# Altium PCB stabilizer_current_sense.PcbDoc (part 3 of 3)
Units mm, origin at the board's own origin, x right, y up, seen from the top; angles counter-clockwise.
Board outline 113.55 x 100 mm, 4 copper layers (Top, L2, L3, Bottom Layer), stack 1.579 mm thick; 178 components, 65 nets, 463 pads, 231 vias.
Unrouted connection lines stored in the file: 53.
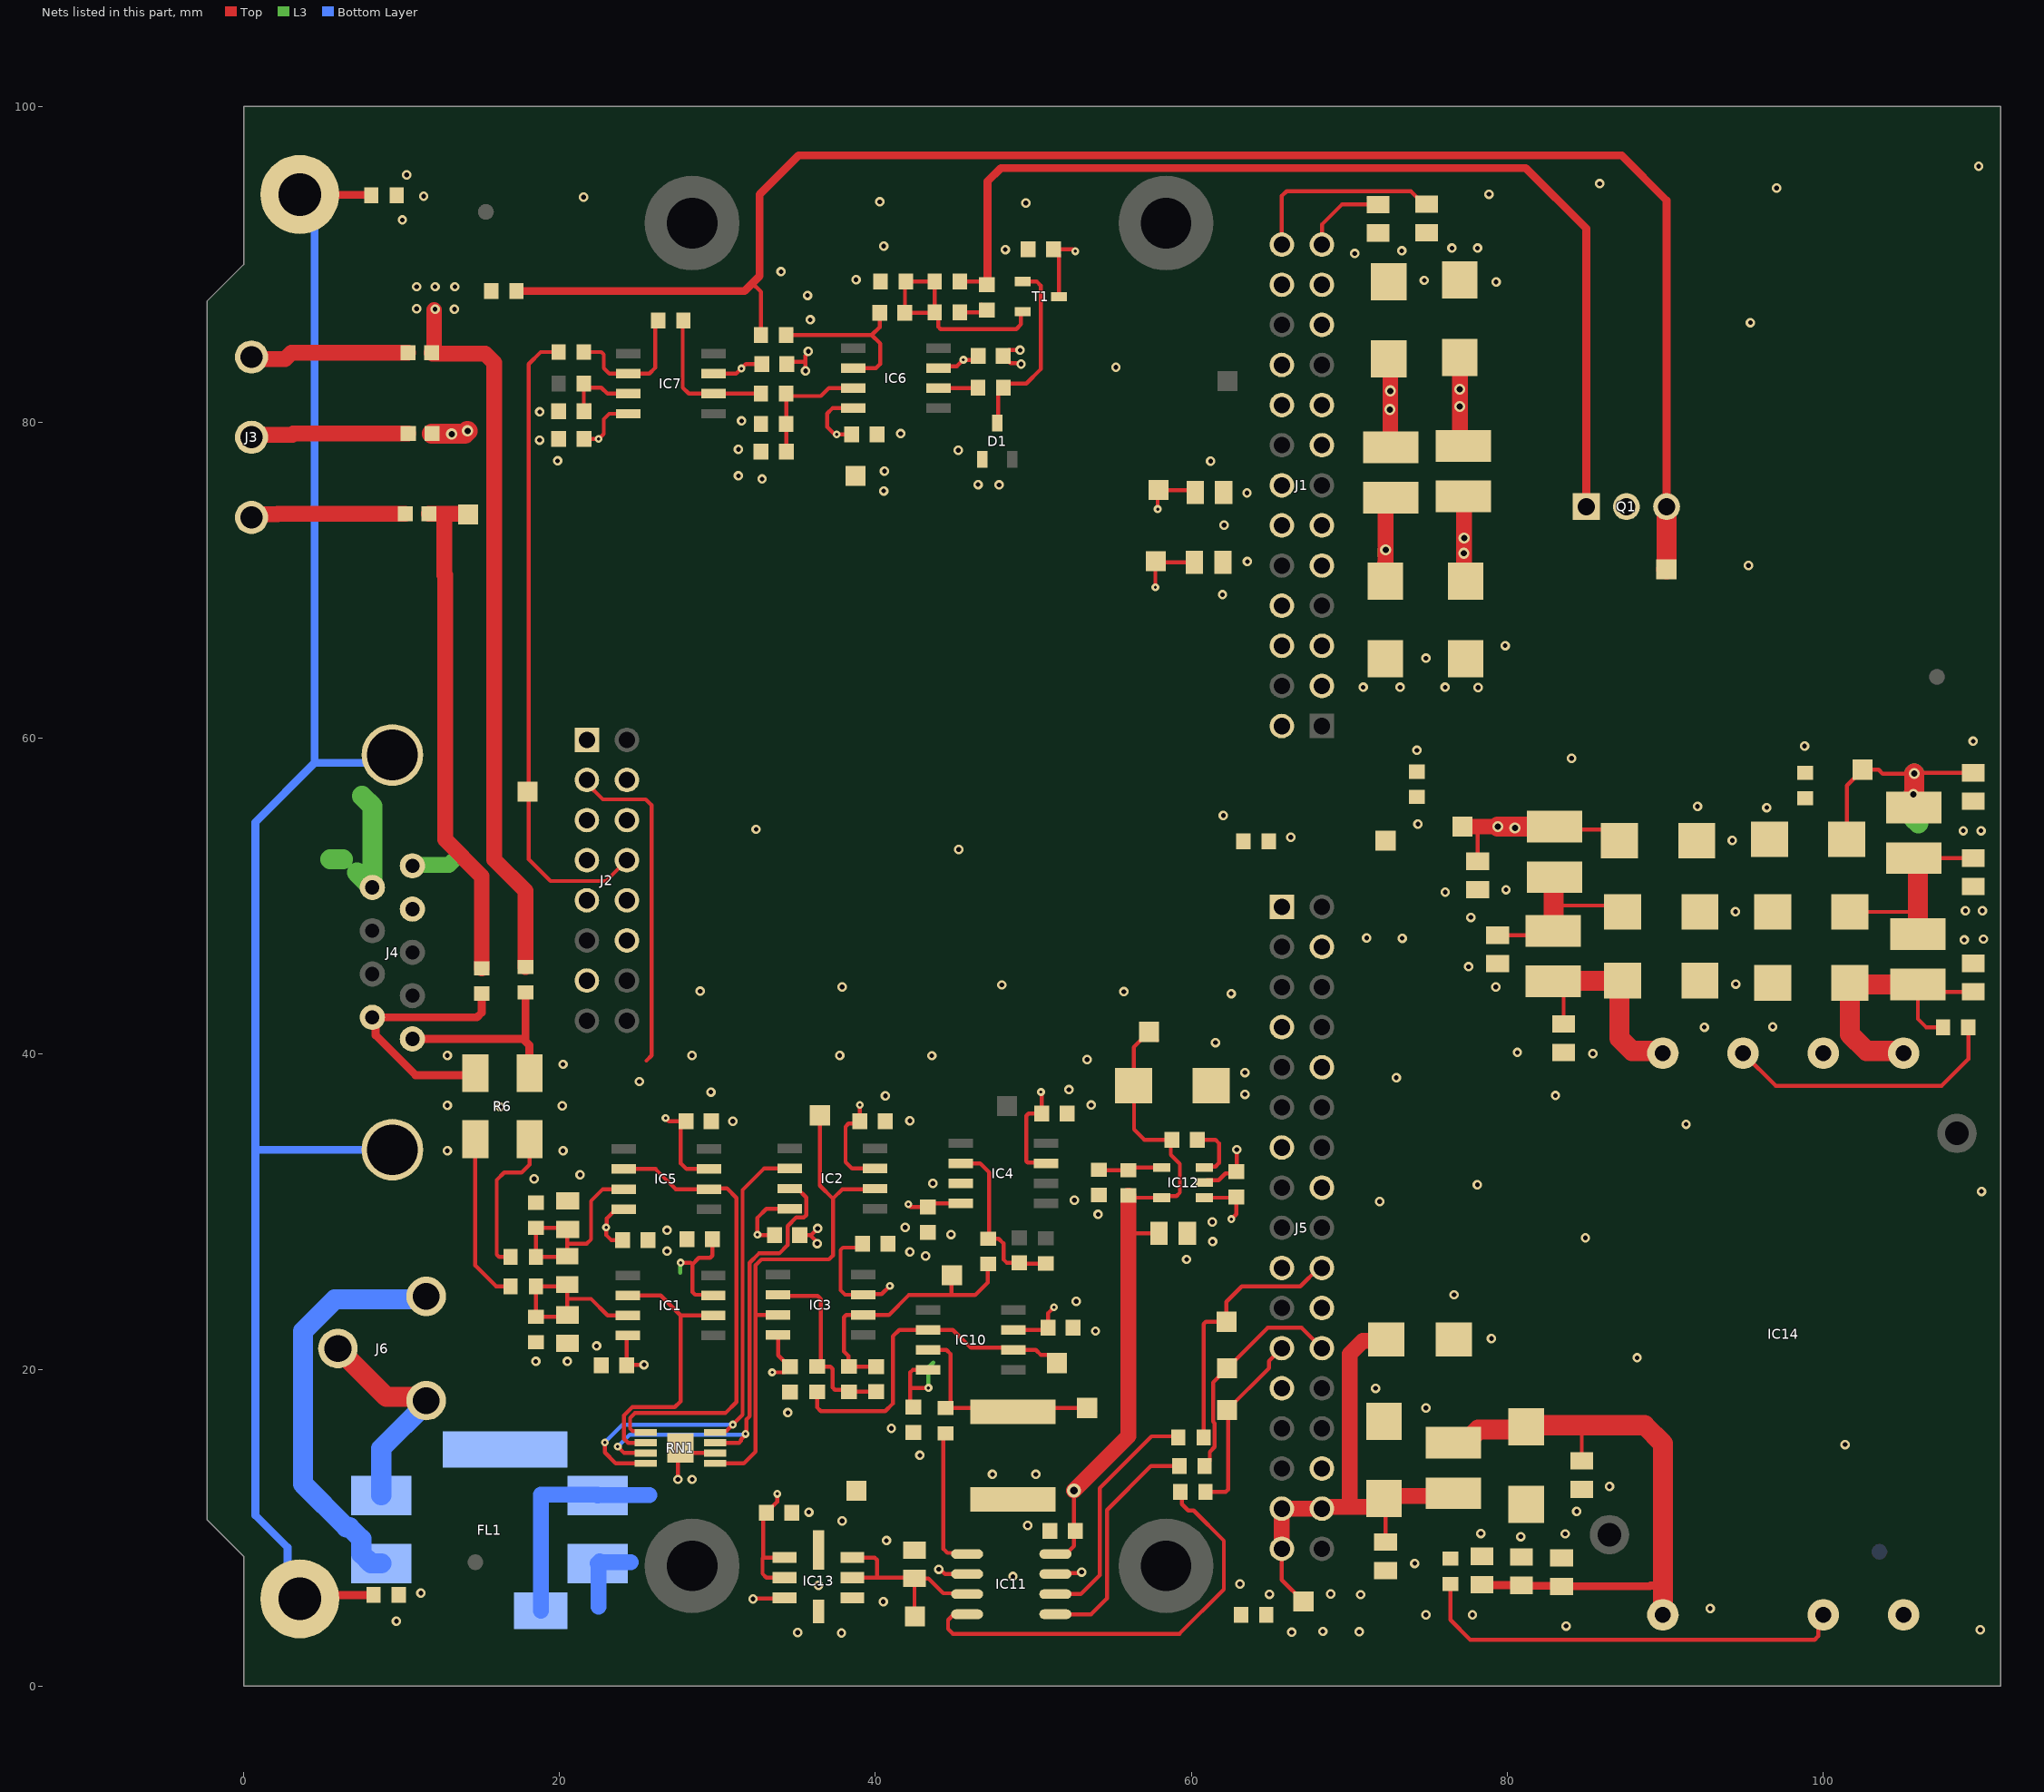
[diagram p4: the nets of this part, all layers, seen from the top]

## Via types
v1: diameter 0.6, hole 0.3, Top to Bottom Layer, tented both sides, 191 vias
v2: diameter 0.5, hole 0.2, Top to Bottom Layer, tented both sides, 26 vias
v3: diameter 0.7, hole 0.4, Top to Bottom Layer, tented both sides, 13 vias
v4: diameter 0.9, hole 0.5, Top to Bottom Layer, tented both sides, 1 vias

## Nets (pads, with @x,y where several pads share a name; then routed paths per layer and width w, separated by ;. In a path a pad name is that pad's centre, name@x,y a point inside that pad or via, vN(x,y) a via of type N, cw(c..) or ccw(c..) an arc to the next point about the centre after c; other vN are vias at no path point) (continued)
COIL_COMMON: C3.1 C5.1 C6.1 C7.1 C8.1 C9.1 C10.1 C11.1 C12.1 C13.1 C14.1 C15.1 C16.1 C17.1 C19.1 C25.1 C26.1 C29.1 C30.1 C33.2 C34.2 C35.1 C36.1 C38.1 C39.2 C40.1 C41.2 C42.1 C43.2 C44.1 C45.1 C46.1 C47.1 C48.1 C49.1 C50.1 D1.1 F1.1 IC4.3 IC11.2 IC11.7 IC12.2 IC13.3 IC13.4 IC13.5 IC13.8 J1.2 J1.3 J1.5 J1.6 J1.8 J1.9 J1.11 J1.12 J1.14 J1.15 J1.17 J1.18 J1.20 J1.21 J1.23 J1.24 J2.1 J2.3 J2.4 J2.5 J2.6 J2.7 J2.9 J2.10 J2.12 J2.13 R5.1 R9.1 R16.1 R18.1 R20.1 R34.1 R40.1 R43.1 R44.1 R47.1 R48.1 R49.1 R50.1 RN1.6 RN1.9 TP13.1 TP14.1 | length 88.1
  Top w0.254: v1@12.059,87.084 v1(12.125,87.15) ; J2.3@21.73,57.35 21.73,57.137 22.747,56.12 25.455,56.12 25.825,55.75 25.825,39.905 25.5,39.58 ; v1(27.499,13.072) 27.499,14.852 RN1.9@27.684,15.036 ; RN1.9@27.654,15.066 RN1.9@27.684,15.036 ; RN1.6@29.854,14.741 27.979,14.741 27.699,15.021 RN1.9@27.684,15.036 ; v1(32.25,5.5) 32.292,5.542 34.208,5.542 IC13.3@34.25,5.583 ; C25.1@34.4,83.687 34.538,83.825 35.575,83.825 ; C13.1@35.209,28.546 35.939,28.546 ; v1(35.575,83.25) 35.575,83.825 ; v1(35.75,84.475) 35.75,84.381 35.575,84.206 35.575,83.825 ; v1(36.309,27.998) 36.309,28.092 35.939,28.463 35.939,28.546 ; v1(36.349,28.956) 35.939,28.546 ; C9.1@40.794,27.998 C9.1@40.878,28.083 ; v1@44.101,7.382 44.404,7.079 IC11.2@45.808,7.079 ; v1(49.16,84.56) 48.448,84.56 48.1,84.212 C26.1@48.1,84.187 48.1,84.162 48.448,83.814 48.473,83.814 48.546,83.741 49.159,83.741 v1(49.225,83.675) ; IC11.7@51.459,7.142 v1@52.998,7.142 ; IC12.2@60.832,31.857 60.98,32.005 61.73,32.005 62.16,32.435 62.735,32.435 C42.1@62.85,32.55 62.875,32.575 v1(62.875,33.95)
  Top w1: v1@12.059,87.084 12.059,84.559 F1.1@11.9,84.4 11.958,84.342 15.289,84.342 15.875,83.757 15.875,52.302 17.85,50.327 R34.1@17.85,45.5
  other v1: 37.85,3.35 35.075,3.384 9.675,4.1 40.5,5.337 11.225,5.875 36.4,6.362 63.08,6.45 48.708,6.928 53.062,7.206 44.008,7.382 40.7,9.2 49.645,10.15 37.9,10.44 35.79,11 28.4,13.072 47.41,13.39 50.16,13.39 42.811,14.596 41.009,16.296 34.459,17.296 18.5,20.541 20.5,20.541 22.35,21.52 53.934,22.462 52.709,24.346 59.7,27 43.183,27.217 42.184,27.471 26.809,27.521 61.35,28.125 44.783,28.575 26.809,28.841 41.884,29.021 61.325,29.375 54.1,29.85 52.6,30.75 43.639,31.812 18.4,32.1 21.303,32.361 12.9,33.875 20.225,33.875 30.975,35.742 42.184,35.772 16.25,36.65 20.173,36.725 12.9,36.75 53.659,36.771 40.634,37.348 63.4,37.45 29.587,37.594 52.259,37.746 25.05,38.257 63.4,38.825 20.225,39.35 53.4,39.65 12.9,39.905 28.383,39.905 37.743,39.905 43.571,39.894 61.525,40.725 62.525,43.825 55.725,43.95 28.9,43.975 37.9,44.25 48,44.375 45.275,52.95 32.45,54.225 62.025,55.1 84.075,58.725 74.275,59.225 98.825,59.5 109.5,59.8 78.16,63.2 70.882,63.22 73.22,63.22 76.07,63.22 74.85,65.06 79.875,65.85 61.975,69.075 95.275,70.925 63.55,71.175 62.075,73.479 63.525,75.525 40.525,75.644 47.825,76.025 46.5,76.05 32.825,76.4 31.325,76.6 40.575,76.9 61.225,77.53 19.875,77.55 45.25,78.225 31.325,78.275 18.74,78.86 41.6,79.275 31.525,80.075 18.75,80.65 55.225,83.475 95.4,86.3 35.875,86.481 13.35,87.15 10.95,87.175 35.7,88.025 10.95,88.575 12.125,88.575 13.375,88.575 79.3,88.875 74.75,88.975 38.775,89.025 34.025,89.525 70.35,90.675 73.325,90.85 48.225,90.925 76.5,91.019 78.123,91.019 40.525,91.15 10.05,92.8 49.525,93.875 40.275,93.95 21.525,94.25 11.4,94.3 78.85,94.425 97.05,94.825 85.85,95.1 10.325,95.65 109.85,96.2
COIL_HIGH: F2.1 Q1.2 | length 2.3
  Top w1.27: F2.1@11.925,79.275 14,79.275 v3(14.175,79.45)
  other v3: 13.17,79.25
COIL_LOW: F3.1 R33.1 TP10.1 | length 32.3
  Top w1: F3.1@11.725,74.2 12.89,74.2 ; 12.71,70.33 12.71,74.02 12.89,74.2 ; 12.76,70.33 12.76,53.579 15.075,51.264 R33.1@15.075,45.426 ; TP10.1@14.225,74.15 14.175,74.2 12.89,74.2
DAC0_P: J2.8 R11.1 TP5.1 | length 40.9
  Top w0.254: R11.1@19.94,84.437 18.812,84.437 18.046,83.671 18.046,52.329 19.425,50.95 22.95,50.95 J2.8@24.27,52.27
FP_GND: J4.10 J4.11 R43.2 R44.2 ST2.0 ST2.1 | length 115.1
  Top w0.5: ST2.0@2.788,6.28 ST2.0@3.556,5.512 ; ST2.1@3.556,94.412 3.587,94.381 8.055,94.381 R44.2@8.086,94.35 ; ST2.0@3.794,5.75 R43.2@8.225,5.75
  Top w1: ST2.0@3.556,5.512 ST2.0@3.794,5.75
  Bottom Layer w0.5: ST2.0@2.788,6.28 2.788,8.762 0.75,10.8 0.75,33.905 ; ST2.1@3.556,94.412 4.5,93.468 4.5,58.425 ; J4.10@9.42,33.94 0.785,33.94 0.75,33.905 ; J4.11@9.42,58.93 8.915,58.425 4.5,58.425 ; 0.75,33.905 0.75,54.675 4.5,58.425
FRONTEND_OFFSET: IC10.2 IC10.6 R1.1 TP11.1 | length 21.9
  Top w0.254: R1.1@36.304,18.618 36.304,17.636 36.544,17.396 40.629,17.396 41.1,17.867 41.1,22.13 41.509,22.538 IC10.2@43.344,22.538 44.909,22.538 46.044,21.403 48.609,21.403 IC10.6@48.744,21.268 50.16,21.268 50.483,20.945 50.988,20.945 TP11.1@51.496,20.437 ; TP11.1@51.209,20.434 TP11.1@51.309,20.334
GND1: C51.1 C52.2 C53.1 C54.2 C55.1 C56.2 C57.1 C58.2 C59.2 C60.1 C61.1 C62.1 C63.1 C64.1 C65.1 C66.1 C67.1 C68.1 C69.1 D3.2 FL1.4 IC14.3 IC14.5 J4.4 J5.1 J5.4 J5.7 J5.10 J5.13 J5.16 J5.19 J5.22 J5.25 J5.30 R41.1 R47.2 R48.2 R49.2 R50.2 TP15.1 | length 14.6
  L3 w1: J4.4@10.69,49.013 J4.4@10.69,49.175
  Bottom Layer w1: J4.4@10.69,49.175 J4.4@10.69,49.337 ; FL1.4@18.817,4.756 18.817,12.097 22.376,12.097 FL1.4@22.417,12.056 22.431,12.07 25.7,12.07
  other v1: 66.35,3.4 70.637,3.425 68.325,3.45 109.95,3.55 83.725,3.792 74.85,4.5 77.8,4.5 92.85,4.9 70.725,5.775 64.95,5.803 68.825,5.821 74.15,7.75 80.857,9.45 83.675,9.625 78.325,9.65 84.4,11.05 86.475,12.625 101.391,15.275 74.85,17.594 71.667,18.84 88.225,20.775 79,21.99 76.64,24.76 84.95,28.36 71.92,30.66 110.025,31.3 78.11,31.72 91.325,35.55 83.055,37.375 72.98,38.5 85.425,40.025 80.643,40.1 92.478,41.7 96.812,41.725 79.275,44.24 94.475,44.427 77.55,45.525 108.937,47.222 110.15,47.275 73.35,47.325 71.104,47.35 77.7,48.65 94.45,49.018 109.014,49.075 110.082,49.075 76.075,50.25 79.925,50.4 94.25,53.525 66.3,53.725 108.875,54.137 110,54.137 74.35,54.55 96.437,55.6 92.05,55.675
N12V0A: C11.2 C12.2 C13.2 C14.2 C15.2 C29.2 C30.2 C34.1 C49.2 C50.2 IC1.4 IC2.4 IC3.4 IC4.4 IC5.4 IC6.4 IC7.4 IC10.4 L2.2 TP22.1 | length 42.4
  Top w0.254: C29.2@21.54,78.937 v2(22.48,78.937) 22.8,79.257 22.8,80.187 23.145,80.532 IC7.4@24.35,80.532 ; C12.2@24.002,28.21 23.286,28.21 22.95,28.546 v2(22.95,29.021) 22.997,29.068 22.997,29.598 23.578,30.178 IC5.4@24.053,30.178 ; IC1.4@24.338,22.178 24.252,22.092 C11.2@24.252,20.298 24.283,20.33 v1(25.356,20.33) ; v2(33.461,19.848) 34.241,19.848 C14.2@34.589,20.196 34.564,20.196 33.839,20.921 IC3.4@33.839,22.218 ; C13.2@33.461,28.695 C13.2@33.609,28.546 32.559,28.546 v2(32.534,28.571) 32.534,29.638 33.105,30.208 IC2.4@34.589,30.208 ; C30.2@38.508,79.225 v2(37.55,79.225) 37.425,79.225 36.95,79.7 36.95,80.55 37.282,80.882 IC6.4@38.6,80.882 IC6.4@38.508,80.79 ; v2(42.084,30.496) 42.059,30.471 42.222,30.308 C15.2@43.323,30.308 43.556,30.542 IC4.4@45.401,30.542 ; C34.1@42.409,17.639 42.209,17.839 42.209,18.846 ; IC10.4@43.344,19.998 42.359,19.998 42.209,19.848 42.209,18.846 ; v2(43.359,18.871) 43.334,18.846 42.209,18.846 ; v2(57.725,69.55) 57.725,71.35 TP22.1@57.75,71.375 ; TP22.1@57.75,71.2 57.825,71.125 C49.2@60.2,71.125
  Top w1: L2.2@72.26,75.19 72.303,75.147 72.303,71.103 72.275,71.075 C50.2@72.275,70.775
  L3 w0.254: v2(43.359,18.871) 43.359,20.171 43.659,20.471
  L3 w1: v3@72.26,71.62 72.26,71.88 v3(72.303,71.923)
N12V0AS: C47.2 C48.2 J1.26 L2.1 | length 18.6
  Top w0.254: J1.26@65.73,91.24 65.73,94.32 66.035,94.625 73.9,94.625 74.725,93.8 C47.2@74.9,93.8 ; C48.2@72.5,84 C48.2@72.6,84.1
  Top w1: C48.2@72.6,84.1 72.639,84.061 72.6,84.022 v3(72.6,81.979) 72.6,78.452 L2.1@72.639,78.413
  other v3: 72.58,80.8
N15V0: C68.2 C69.2 J4.5 L7.2 TP25.1 | length 20.4
  Top w0.254: C69.2@101.5,53.6 101.5,57 TP25.1@102.5,58 103.516,58 103.766,57.75 v3(105.775,57.75) ; v3@105.825,57.8 C68.2@109.5,57.8
  Top w1.27: v3(105.72,56.43) 105.72,55.63 L7.2@105.75,55.6 ; L7.2@105.75,56.43 105.775,56.455 v3(105.775,57.75)
  L3 w1: J4.5@10.633,51.972 J4.5@10.69,51.915 10.74,51.965 12.99,51.965 13.425,52.4
  L3 w1.27: v3(105.775,57.75) 105.775,56.485 v3(105.72,56.43) 105.72,54.92 106.04,54.6
NetC1_1: C1.1 IC3.2 R1.2 R2.1 | length 11.5
  Top w0.254: IC3.2@34.594,24.693 36.349,24.693 36.544,24.498 36.544,20.541 36.301,20.298 R1.2@36.224,20.298 ; R1.2@36.304,20.218 37.145,20.218 37.294,20.069 37.294,18.897 37.442,18.748 38.204,18.748 R2.1@38.334,18.618 C1.1@40.044,18.618
NetC1_2: C1.2 IC3.6 R2.2 R7.1 TP3.1 | length 17.6
  Top w0.254: R2.2@38.214,20.218 R2.2@38.294,20.298 ; C1.2@40.044,20.218 R2.2@38.334,20.218 38.294,20.258 R2.2@38.294,20.298 ; TP3.1@44.847,25.996 44.809,25.959 44.809,24.735 ; R7.1@47.153,26.708 47.109,26.665 47.109,25.533 46.312,24.735 44.809,24.735 ; R2.2@38.294,20.298 38.294,20.885 38.009,21.169 38.009,23.339 38.158,23.488 IC3.6@39.239,23.488 40.86,23.488 42.107,24.735 44.809,24.735
NetC2_1: C2.1 IC4.2 R3.1 R7.2 | length 11.2
  Top w0.254: IC4.2@45.401,33.082 46.624,33.082 47.209,32.496 47.209,28.365 R7.2@47.153,28.308 47.809,28.308 48.109,28.008 48.109,26.996 48.309,26.796 C2.1@49.043,26.796 ; C2.1@49.109,26.775 49.088,26.796 C2.1@49.043,26.796 ; R3.1@50.79,26.737 49.102,26.737 C2.1@49.043,26.796
NetC3_2: C3.2 C4.2 IC1.3 R4.2 R5.2 | length 12.2
  Top w0.254: IC1.3@24.338,23.448 23.053,23.448 22,24.501 20.5,24.501 ; 20.5,24.501 C4.2@20.5,25.402 20.399,25.301 R4.2@18.5,25.301 R5.2@18.5,23.36 20.379,23.36 C3.2@20.5,23.481 20.5,24.501
NetC4_1: C4.1 C5.2 IC5.3 R8.2 R9.2 | length 14
  Top w0.254: C5.2@20.5,28.901 C5.2@20.5,28.882 ; C5.2@20.519,28.901 C5.2@20.5,28.882 ; IC5.3@24.053,31.448 22.747,31.448 22,30.701 22,28.268 21.73,27.998 20.5,27.998 ; 20.5,27.998 C5.2@20.5,28.882 ; 20.5,27.998 C4.1@20.5,27.202 20.448,27.15 R8.2@18.5,27.15 R9.2@18.5,28.991 20.391,28.991 C5.2@20.5,28.882
NetC17_2: C17.2 IC6.3 R13.2 R16.2 | length 7.9
  Top w0.254: C17.2@34.35,78.142 R16.2@34.35,79.892 34.35,81.5 34.501,81.651 36.55,81.651 37.051,82.152 IC6.3@38.6,82.152
NetC18_1: C18.1 R17.2 | length 2.3
  Top w0.254: R17.2@45.35,86.948 46.905,86.948 C18.1@47.05,87.092 C18.1@46.702,87.44
NetC18_2: C18.2 Q1.1 R14.2 | length 65.6
  Top w0.254: R14.2@45.495,89.037 R14.2@45.35,88.892 C18.2@46.85,88.892
  Top w0.5: C18.2@46.85,88.892 47.075,88.892 47.1,88.917 47.1,95.25 47.94,96.09 81.179,96.09 85.01,92.259 Q1.1@85.01,74.775
NetC19_2: C19.2 IC7.3 R15.2 | length 5.3
  Top w0.254: C19.2@21.54,80.687 C19.2@21.54,80.712 ; C19.2@21.913,81.06 21.888,81.06 C19.2@21.54,80.712 ; IC7.3@24.35,81.802 23.036,81.802 22.651,82.187 21.79,82.187 R15.2@21.54,82.437 C19.2@21.54,80.712
NetC20_1: C20.1 IC6.2 R19.1 | length 11.4
  Top w0.254: R19.1@34.673,85.835 R19.1@34.35,85.512 39.768,85.512 ; IC6.2@38.6,83.422 40.035,83.422 40.3,83.687 40.3,84.98 39.768,85.512 ; C20.1@40.27,86.925 40.27,86.015 39.768,85.512
NetC20_2: C20.2 R14.1 R17.1 R18.2 T1.2 | length 14.9
  Top w0.254: T1.2@49.315,86.992 49.215,86.892 49.215,86.192 48.915,85.892 44.121,85.892 43.972,86.041 43.972,86.725 R17.1@43.75,86.948 ; R17.1@43.75,86.948 43.727,86.925 C20.2@41.87,86.925 41.87,88.845 R18.2@41.925,88.9 43.742,88.9 R14.1@43.75,88.892 R17.1@43.75,86.948
NetC37_1: C37.1 IC12.3 | length 4
  Top w0.254: C37.1@60.551,34.751 C37.1@60.375,34.575 61.525,34.575 61.75,34.35 61.75,33.1 61.525,32.875 60.9,32.875 IC12.3@60.832,32.807
NetC51_2: C51.2 C52.1 IC14.7 L3.1 | length 14.2
  Top w0.254: L3.1@82.9,44.6 83.573,43.927 C51.2@83.573,41.9
  Top w1.27: L3.1@82.9,44.6 82.925,44.625 C52.1@87.275,44.625 ; C52.1@87.3,44.65 C52.1@87.275,44.625 ; IC14.7@89.855,40.055 89.715,40.195 87.905,40.195 87.1,41 87.1,44.45 C52.1@87.275,44.625
NetC53_2: C53.2 C54.1 L3.2 L4.1 | length 12
  Top w0.254: C53.2@79.4,47.522 82.622,47.522 L3.2@82.9,47.8 ; 82.95,49.4 86.9,49.4 C54.1@87.3,49 C54.1@87.02,48.72
  Top w1.27: L3.2@82.9,47.8 82.95,47.85 82.95,49.4 82.95,51.15 L4.1@83,51.2
NetC59_1: C59.1 C60.2 C61.2 C62.2 C63.2 IC14.1 L5.2 | length 38.4
  Top w0.254: C60.2@84.72,14.242 84.72,16.22 85,16.5
  Top w0.5: C63.2@78.4,6.4 78.419,6.381 80.881,6.381 C61.2@80.9,6.362 80.931,6.331 83.411,6.331 C62.2@83.442,6.3 89.037,6.3 89.087,6.349 89.855,6.349
  Top w1: IC14.1@89.7,4.313 IC14.1@89.852,4.161 ; IC14.1@89.853,4.498 IC14.1@89.855,4.495
  Top w1.27: L5.2@77.35,15.4 78.17,16.22 81.02,16.22 C59.1@81.2,16.4 81.3,16.5 85,16.5 88.7,16.5 89.855,15.345 89.855,6.349 IC14.1@89.855,4.495
NetC64_2: C64.2 C65.2 IC14.4 L6.1 R42.1 | length 19.2
  Top w0.254: C65.2@101.7,44.4 C65.2@101.8,44.4 ; L6.1@105.4,44.4 L6.1@106,44.4 ; R42.1@107.594,41.7 106.52,41.7 106,42.22 L6.1@106,44.4 ; C64.2@109.5,43.935 106.465,43.935 L6.1@106,44.4
  Top w1.27: C65.2@101.7,44.4 101.7,41.249 102.755,40.195 104.955,40.195 IC14.4@105.095,40.055 ; C65.2@101.7,44.5 101.8,44.4 L6.1@105.4,44.4
NetC66_2: C66.2 C67.2 L6.2 L7.1 | length 12.9
  Top w0.254: C67.2@101.7,49 105.625,49 105.875,49.25 ; L7.1@105.75,52.4 C66.2@109.5,52.4
  Top w1.27: L7.1@105.75,52.4 106,52.15 L6.2@106,47.6
NetD1_3: D1.3 R12.2 T1.1 | length 11.8
  Top w0.254: D1.3@47.715,79.942 47.777,80.004 47.777,81.864 R12.2@48.1,82.187 48.35,82.437 49.55,82.437 50.465,83.352 50.465,88.652 50.225,88.892 T1.1@49.315,88.892
NetF1_2: F1.2 J3.1 | length 10.1
  Top w1: J3.1@0.5,84.125 0.625,84 2.625,84 3.025,84.4 F1.2@10.4,84.4
NetF2_2: F2.2 J3.2 | length 10
  Top w1: J3.2@0.5,79.045 0.655,79.2 3.075,79.2 3.15,79.275 F2.2@10.425,79.275
NetF3_2: F3.2 J3.3 | length 9.8
  Top w1: J3.3@0.5,73.965 0.71,74.175 2.15,74.175 2.175,74.2 F3.2@10.225,74.2
NetFL1_1: FL1.1 J6.3 | length 25.9
  Bottom Layer w1.27: FL1.1@8.717,7.756 8.067,7.756 7.452,8.371 7.452,9.3 6.708,10.044 6.501,10.044 3.76,12.785 3.76,22.45 5.774,24.464 11.564,24.464 J6.3@11.6,24.5
NetFL1_3: FL1.3 J6.1 J6.2 | length 14
  Top w1.27: J6.1@5.97,21.36 9.035,18.295 11.325,18.295 J6.2@11.56,18.06
  Bottom Layer w1.27: FL1.3@8.717,12.056 8.717,15.034 11.583,17.9 J6.2@11.6,17.9
NetIC1_2: IC1.2 IC1.6 RN1.2 | length 18.4
  Top w0.254: IC1.2@24.338,24.718 26.403,24.718 27.673,23.448 ; RN1.2@25.454,15.391 25.428,15.364 25.401,15.391 24.337,15.391 24.087,15.641 24.087,17.122 24.612,17.647 27.299,17.647 27.663,18.01 ; 27.673,18.01 27.673,23.448 ; IC1.6@29.85,23.56 IC1.6@29.738,23.448 27.673,23.448
NetIC2_2: IC2.2 RN1.4 RN1.8 | length 31.7
  Top w0.254: v2(22.869,15.42) 22.869,14.776 23.554,14.091 RN1.4@25.454,14.091 ; RN1.8@29.854,16.041 29.952,16.139 30.565,16.139 v2(30.968,16.543) 31.59,17.165 31.59,31.394 32.944,32.748 IC2.2@34.25,32.748
  Bottom Layer w0.254: v2(22.869,15.42) 23.993,16.543 v2(30.968,16.543)
NetIC2_3: IC2.3 RN1.3 RN1.7 | length 31.5
  Top w0.254: v2(23.689,15.146) 24.094,14.741 RN1.3@25.454,14.741 ; RN1.7@29.624,15.391 RN1.7@29.634,15.382 ; RN1.7@29.854,15.391 31.372,15.391 31.494,15.513 31.494,15.592 31.783,15.882 v2(31.783,15.948) ; v2@31.856,15.875 31.831,15.901 31.831,16.866 32.033,17.069 32.033,26.789 32.623,27.378 33.911,27.378 34.447,27.914 34.447,29.118 34.983,29.654 35.469,29.654 35.618,29.803 35.618,30.924 35.064,31.478 IC2.3@34.589,31.478
  Bottom Layer w0.254: v2(23.689,15.146) 24.455,15.912 31.747,15.912 v2(31.783,15.948)
NetIC5_2: IC5.2 IC5.6 RN1.1 | length 29.9
  Top w0.254: IC5.2@24.053,32.718 26.083,32.718 27.353,31.448 IC5.6@29.453,31.448 29.491,31.487 30.609,31.487 31.209,30.886 31.209,17.968 ; RN1.1@25.454,16.041 25.356,16.139 24.616,16.139 24.468,16.288 24.468,16.498 24.469,16.5 24.469,16.966 24.769,17.266 30.497,17.266 31.199,17.968 ; RN1.1@25.901,16.139 RN1.1@25.999,16.041
NetIC6_6: IC6.6 R12.1 | length 2.5
  Top w0.254: IC6.6@44,82.152 46.465,82.152 R12.1@46.5,82.187
NetIC7_2: IC7.2 R10.1 R11.2 | length 9
  Top w0.254: R11.2@21.655,84.322 R11.2@21.54,84.437 22.651,84.437 22.8,84.289 22.8,83.422 23.15,83.072 IC7.2@24.35,83.072 25.685,83.072 26.05,83.437 26.05,86.237 R10.1@26.25,86.437
NetIC7_6: IC7.6 R10.2 R13.1 | length 9.4
  Top w0.254: R10.2@27.85,86.437 27.8,86.387 27.8,82.187 28.185,81.802 IC7.6@29.75,81.802 R13.1@32.75,81.802
NetIC11_1: IC11.1 R35.1 | length 8.9
  Top w0.254: 44.3,8.671 R35.1@44.3,15.994 ; 44.308,8.671 44.562,8.417 IC11.1@45.74,8.417
NetIC11_4: IC11.4 R38.1 | length 27.4
  Top w0.254: 44.6,4.183 44.6,3.6 44.9,3.3 59.251,3.3 62.063,6.112 62.063,9.187 60.15,11.1 59.8,11.1 59.4,11.5 59.4,12.175 R38.1@59.3,12.275 ; 44.608,4.183 IC11.4@44.963,4.539
NetIC11_5: IC11.5 R37.2 | length 15.1
  Top w0.127: R37.2@59.403,14.054 R37.2@59.442,14.015
  Top w0.254: IC11.5@51.396,4.539 53.665,4.539 54.669,5.543 ; 54.661,5.543 54.661,11.136 57.44,13.915 R37.2@59.25,13.915
NetIC11_6: IC11.6 R36.2 | length 15.4
  Top w0.254: IC11.6@51.396,5.809 53.005,5.809 54.208,7.012 ; 54.2,7.012 54.2,12.521 57.479,15.8 R36.2@59.375,15.8 ; R36.2@59.317,15.875 R36.2@59.367,15.825
NetIC12_4: IC12.4 R39.1 R40.2 | length 4
  Top w0.254: R40.2@54.15,32.675 54.175,32.65 R39.1@56.025,32.65 ; R39.1@56.025,32.807 IC12.4@58.132,32.807
NetIC14_2: IC14.2 R41.2 | length 27.7
  Top w0.254: R41.2@76.4,6.45 76.4,4.175 77.655,2.92 99.46,2.92 99.689,3.149 99.689,4.169 IC14.2@100.015,4.495
NetIC14_6: IC14.6 R42.2 | length 17.8
  Top w0.254: IC14.6@94.935,40.055 97.01,37.98 107.5,37.98 109.194,39.674 R42.2@109.194,41.7
NetQ1_3: Q1.3 R19.2 R20.2 TP7.1 | length 107.6
  Top w0.254: 32.211,88.792 32.75,88.252 R19.2@32.75,85.512 R19.2@32.675,85.587
  Top w0.5: R20.2@17.275,88.3 31.719,88.3 32.211,88.792 32.675,89.256 32.675,94.425 35.13,96.88 87.245,96.88 90.09,94.035 Q1.3@90.09,74.775
  Top w1.27: TP7.1@90.075,70.675 90.09,70.69 Q1.3@90.09,74.775
NetR4_1: R4.1 R6.E2 | length 10.9
  Top w0.254: R6.E2@14.67,34.6 14.67,26.609 15.978,25.301 R4.1@16.9,25.301 ; R6.E2@15.1,34.73 R6.E2@15.17,34.8
NetR6_E1: R6.E1 R8.1 | length 9.7
  Top w0.254: R8.1@16.9,27.15 16.174,27.15 16.025,27.299 16.025,32.025 16.5,32.5 17.6,32.5 18.1,33 R6.E1@18.1,34.6
P5V0: C36.2 C37.2 C43.1 C44.2 C45.2 IC11.8 IC12.5 IC13.1 IC13.2 R39.2 TP20.1 | length 52.9
  Top w0.254: v2(33.792,12.155) 33.792,11.661 33.105,10.975 C45.2@33.105,10.95 32.9,10.745 32.9,8.123 ; IC13.2@34.25,6.853 33.105,6.853 32.855,7.103 32.855,8.078 32.9,8.123 ; IC13.1@34.25,8.123 32.9,8.123 ; IC11.8@51.396,8.349 52.063,8.349 52.57,8.855 v4(52.57,12.37) ; 56.025,28.75 56.125,28.65 C44.2@57.95,28.65 C44.2@58.175,28.425 ; R39.2@56.025,30.907 IC12.5@58.132,30.907 58.239,31.013 59.063,31.013 59.275,31.225 59.275,33.05 58.7,33.625 58.7,34.5 C37.2@58.775,34.575 57.025,34.575 56.375,35.225 56.375,37.975 C43.1@56.35,38 56.35,40.427 TP20.1@57.325,41.402 TP20.1@57.833,40.894
  Top w0.508: C43.1@55.813,38.613 C43.1@55.9,38.7 ; R39.2@56.025,30.854 56.071,30.9 R39.2@56.175,30.9
  Top w1: v4(52.57,12.37) 56.025,15.825 56.025,28.75 56.025,30.854 56.025,30.907 R39.2@56.025,31.05
P12V0A: C6.2 C7.2 C8.2 C9.2 C10.2 C16.2 C25.2 C26.2 C35.2 C40.2 C41.1 C42.2 IC1.7 IC2.7 IC3.7 IC4.7 IC5.7 IC6.7 IC7.7 IC10.7 IC12.1 L1.2 T1.3 TP19.1 | length 60
  Top w0.254: v2(26.709,35.946) 26.913,35.742 C7.2@28.009,35.742 27.673,35.405 27.673,33.083 28.038,32.718 IC5.7@29.453,32.718 ; v2(27.664,26.796) 28.296,26.796 28.409,26.683 ; C6.2@29.679,28.275 29.679,27.245 29.53,27.096 28.823,27.096 28.409,26.683 ; IC1.7@29.738,24.718 29.695,24.761 28.582,24.761 28.409,24.933 28.409,26.683 ; IC7.7@29.75,83.072 31.185,83.072 v2(31.513,83.4) 31.8,83.687 C25.2@32.8,83.687 ; v2(39.009,36.771) C8.2@39.009,35.742 38.865,35.598 38.302,35.598 38.109,35.405 38.109,33.163 38.525,32.748 IC2.7@39.989,32.748 ; C9.2@39.194,27.998 38.944,27.748 37.942,27.748 37.794,27.599 37.794,25.047 38.083,24.758 IC3.7@39.239,24.758 39.276,24.795 40.395,24.795 v2(40.921,25.321) ; IC6.7@44,83.422 44.121,83.543 45.156,83.543 45.55,83.937 v2@45.562,83.937 ; v2(45.575,83.95) v2@45.562,83.937 ; C26.2@46.5,84.187 46.25,83.937 v2@45.562,83.937 ; IC10.7@48.744,22.538 50.789,22.538 C35.2@50.924,22.673 50.924,23.585 v2(51.309,23.971) ; v2(50.484,37.597) 50.54,37.541 C10.2@50.54,36.231 49.705,36.231 49.556,36.082 49.556,33.214 49.645,33.125 50.758,33.125 IC4.7@50.801,33.082 ; T1.3@51.615,87.942 51.613,87.944 51.613,90.594 C16.2@51.265,90.942 52.523,90.942 v2(52.65,90.815) ; v2(57.869,74.5) 57.869,75.644 TP19.1@57.925,75.7 60.1,75.7 C40.2@60.25,75.55 ; IC12.1@60.832,30.907 62.807,30.907 C42.2@62.85,30.95 62.85,29.859 v2(62.541,29.55)
  Top w1: L1.2@77.23,75.3 77.27,75.26 v3(77.27,72.66) 77.27,70.78 C41.1@77.325,70.725
  L3 w0.254: 27.634,26.146 27.634,26.766 v2(27.664,26.796)
  other v3: 77.26,71.7
P12V0AS: C38.2 C39.1 J1.25 L1.1 | length 11.2
  Top w0.254: J1.25@68.27,91.24 68.27,92.514 69.531,93.775 71.65,93.775 C38.2@71.227,94.198
  Top w1: C39.1@77,84.1 v3(77,82.09) 77,79.1 L1.1@77.3,78.8
  other v3: 77,80.99
P12V0S: C57.2 C58.1 D3.1 FL1.2 J5.31 J5.32 J5.33 L5.1 TP24.1 | length 38.5
  Top w0.254: J5.33@65.73,8.68 65.73,6.716 TP24.1@67.1,5.346 ; J5.31@65.73,10.9 J5.31@65.73,11.22 ; C58.1@72.2,11.858 72.3,11.758 C57.2@72.3,9.1 ; C57.2@72.325,9.12 C57.2@72.352,9.093
  Top w1: J5.33@65.73,8.68 J5.31@65.73,10.9 ; J5.31@65.73,11.22 J5.32@68.27,11.22 68.375,11.325 70.025,11.325 ; D3.1@72.33,21.93 72.24,21.84 70.86,21.84 70.025,21.005 70.025,11.325 ; L5.1@77.1,12.2 L5.1@76.6,12.2 76.325,12.2 76.1,11.975 76.046,12.029 72.371,12.029 C58.1@72.2,11.858 71.667,11.325 70.025,11.325
  L3 w1.27: J5.32@68.27,11.22 J5.32@68.27,11.296
  Bottom Layer w1: FL1.2@22.417,7.756 FL1.2@22.47,7.703 ; 22.47,5.006 FL1.2@22.47,7.703 ; 24.52,7.82 22.607,7.82 22.544,7.883 22.47,7.809 FL1.2@22.47,7.703
P15V0: C55.2 C56.1 J4.9 L4.2 TP23.1 | length 21
  Top w0.254: C55.2@78.123,52.2 78.123,54.223 78.3,54.4 ; L4.2@83,54.4 83.2,54.2 86.4,54.2 C56.1@87.1,53.5
  Top w1: TP23.1@77.045,54.4 TP23.1@77.171,54.4 78.3,54.4 v3(79.4,54.4)
  Top w1.27: J4.9@8.061,50.545 J4.9@8.15,50.545 ; v3(79.4,54.4) 80.49,54.4 L4.2@83,54.4
  L3 w1.27: 5.475,52.325 6.281,52.325 ; 7.175,51.5 8.13,50.545 J4.9@8.15,50.545 8.15,55.688 7.5,56.338
  other v3: 80.49,54.32
REF_2V5: C46.2 IC11.3 IC13.6 IC13.7 TP21.1 | length 12.8
  Top w0.254: IC13.6@38.55,6.853 40.1,6.853 ; IC13.7@38.55,8.123 39.951,8.123 40.1,7.974 40.1,6.853 ; TP21.1@42.5,4.4 42.475,4.425 C46.2@42.475,6.8 ; IC11.3@45.808,5.809 45.753,5.863 44.296,5.863 43.359,6.8 C46.2@42.475,6.8 ; 40.1,6.853 42.422,6.853 C46.2@42.475,6.8
SPI_CLK: J5.24 R37.1 TP16.1 | length 14.5
  Top w0.254: R37.1@60.85,13.915 61.173,14.238 61.173,14.814 61.479,15.12 61.479,16.626 61.379,16.726 61.379,19.211 TP16.1@62.268,20.1 64.841,22.673 66.977,22.673 J5.24@68.27,21.38
SPI_CS: J5.23 R38.2 TP18.1 | length 11.9
  Top w0.254: R38.2@60.9,12.275 62.176,12.275 62.325,12.424 62.325,17.409 TP18.1@62.268,17.466 64.913,20.111 64.913,20.563 J5.23@65.73,21.38
SPI_MOSI: J5.20 R36.1 TP17.1 | length 16.9
  Top w0.254: R36.1@60.775,15.725 60.775,22.901 60.924,23.05 TP17.1@62.225,23.05 62.225,24.319 63.2,25.294 66.894,25.294 68.06,26.46 J5.20@68.27,26.46
transformer_Iret: J4.1 R6.I1 R34.2 | length 12.8
  Top w0.508: J4.1@10.69,40.955 17.695,40.955 17.85,40.8 ; R6.I1@17.85,39.04 R6.I1@18.1,38.79 18.1,40.55 17.85,40.8 ; R34.2@17.85,43.9 17.85,40.8
transformer_Isource: J4.6 R6.I2 R33.2 | length 17.5
  Top w0.508: R6.I2@15.075,39.195 R6.I2@14.67,38.79 14.549,38.669 10.881,38.669 8.359,41.191 8.359,42.116 J4.6@8.15,42.325 14.777,42.325 15.075,42.623 R33.2@15.075,43.826
v_DAC: C33.1 IC10.3 R35.2 TP12.1 | length 14.6
  Top w0.254: IC10.3@43.344,21.268 44.5,21.268 44.767,21.001 44.767,17.909 R35.2@44.452,17.594 48.708,17.594 53.736,17.594 TP12.1@53.934,17.396
V_DIFF: IC2.6 IC3.3 RN1.5 TP2.1 | length 32.9
  Top w0.254: RN1.5@30.399,14.091 31.671,14.091 32.404,14.825 ; 32.414,14.825 32.414,23.448 ; IC3.3@33.839,23.488 32.454,23.488 32.414,23.448 ; TP2.1@36.485,36.121 36.485,31.668 37.309,30.843 ; IC2.6@39.994,31.443 37.909,31.443 37.309,30.843 ; 32.414,23.448 32.414,26.631 32.781,26.997 37.063,26.997 37.309,27.244 37.309,30.843
pads on no net: D1.2 FTG1.FTG2 FTG2.FTG2 FTG3.FTG2 FTG4.FTG2 FTG5.FTG2 FTG6.FTG2 IC1.1 IC1.5 IC1.8 IC2.1 IC2.5 IC2.8 IC3.1 IC3.5 IC3.8 IC4.1 IC4.5 IC4.8 IC5.1 IC5.5 IC5.8 IC6.1 IC6.5 IC6.8 IC7.1 IC7.5 IC7.8 IC10.1 IC10.5 IC10.8 IC14.8 IC14.9 J1.1 J1.4 J1.7 J1.10 J1.13 J1.16 J1.22 J2.11 J2.14 J2.15 J2.16 J4.2 J4.3 J4.7 J4.8 J5.2 J5.3 J5.5 J5.6 J5.8 J5.9 J5.11 J5.12 J5.14 J5.15 J5.17 J5.18 J5.21 J5.26 J5.27 J5.28 J5.29 J5.34

## Polygon pours and split planes (outlines as drawn)
COIL_COMMON on Top "Top-COIL_COMMON" (solid, remove dead copper, pour order 20): 8.886,100 8.886,0 63.55,0 63.55,57.464 111.25,57.464 111.25,100
GND1 on Top "GND1_L01_P004" (solid, remove dead copper, pour order 4): 64.3,0 64.3,56.65 111.25,56.65 111.25,0
COIL_LOW on Top "Top-COIL_LOW" (solid, pour order 156): 12.27,71.89 13.24,71.89 13.24,69.82 13.25,69.81 13.24,69.8 12.25,69.8
COIL_COMMON on L2 "L2-COIL_COMMON" (solid, remove dead copper, pour order 26): 63.5,57.45 111.243,57.45 111.25,100 8.875,100 8.875,0 63.5,0
GND1 on L2 "L2-COIL_COMMON 1" (solid, remove dead copper, pour order 6): 64.3,56.65 111.25,56.65 111.25,0 64.3,0
P12V0A on L3 "P12V0A" (solid, remove dead copper, pour order 146): 8.7,19.926 82.325,19.926 82.325,91.975 8.7,91.975
P15V0 on L3 "P15V0" (solid, remove dead copper, pour order 76): 60.225,-0.2 83.15,0 83.15,28.075 83.15,56.625 64.32,56.625 64.32,27.8 60.225,27.8 60.225,19.537 20.575,19.537 20.575,60.76 -2.325,60.76 -2.325,0 -0.05,-0.025 60.225,-0.025
N15V0 on L3 "N15V0" (solid, remove dead copper, pour order 66): 7.229,-0.025 111.4,-0.025 111.2,0.175 111.2,56.62 97.8,56.62 97.8,17.75 64.425,17.75 64.425,12.725 15,12.725 15,54.625 7.229,54.625
N12V0A on L3 "N12V0A" (solid, remove dead copper, pour order 144): 20.565,19.686 44.825,19.686 44.825,23.971 25.009,23.971 25.009,27.595 45.925,27.595 45.925,31.175 45.925,33.94 24.025,33.94 24.025,38.406 39.45,38.406 39.45,65.662 74.45,65.687 74.45,72.5 38.725,72.5 38.725,79.6 38.725,79.825 36.575,79.825 36.575,73.7 26.525,73.7 26.525,79.925 20.599,79.925 20.574,79.95 20.565,79.941 20.565,73.7
GND1 on L3 "L3-GND1 1" (solid, remove dead copper, pour order 54): 64.225,-0.05 70.825,-0.05 70.85,-0.025 70.85,6.175 64.3,6.175 64.275,6.15 64.275,3.575 10.75,3.575 10.75,9.7 7.175,9.7 7.175,38.125 11.488,38.125 12.05,38.687 12.05,50.6 9.925,50.6 9.525,50.663 9.4,50.538 9.4,49.175 7.175,49.175 7.175,50.275 3.95,50.275 3.95,49.125 -2.3,49.125 -2.3,10.499 0,8.199 0,0 64.226,0
COIL_HIGH on L3 "L3-COIL_HIGH" (solid, remove dead copper, pour order 120): 79.488,77.525 79.597,77.417 82.325,77.417 82.325,72.5 82.525,72.3 111.25,72.3 111.25,91.95 111.325,92.025 111.325,99.875 111.15,100.05 111.1,100 9.075,100 8.925,77.4 15.2,77.4 15.2,92.025 79.488,92.025
P12V0AS on L3 "P12V0AS" (solid, remove dead copper, pour order 136): 67.275,92.952 67.275,86.964 74.7,86.966 74.7,80.275 79,80.275 79,92.95 78.975,92.975
N12V0AS on L3 "N12V0AS" (solid, remove dead copper, pour order 140): 64,92.952 79.1,92.952 79.1,80.075 64,80.075
GND1 on L3 "L3-GND1" (solid, remove dead copper, pour order 148): 83.15,56.625 83.175,56.65 97.825,56.65 97.825,17.775 97.8,17.75 83.15,17.75
COIL_COMMON on Bottom Layer "bottom_gnd" (solid, remove dead copper, pour order 150): 9.087,100 111.25,100 111.25,57.475 63.55,57.475 63.5,57.425 63.5,0.004 8.766,0.004
GND1 on Bottom Layer "12V_JACK_GND" (solid, remove dead copper, pour order 92): 11.762,17.575 19,17.575 19.18,17.575 19.75,17.575 69.407,17.575 69.407,9.87 11.689,9.87
P5V0 on Bottom Layer "P5V0" (solid, remove dead copper, pour order 78): 53.075,14.2 53.1,14.175 53.1,11.95 32.325,11.95 32.325,12.675 32.325,14.075
P12V0S on Bottom Layer "JACK_PWR_IN" (solid, remove dead copper, pour order 90): 19.805,0.002 69.57,0.027 69.57,12.406 64.62,12.406 64.62,9.949 19.805,9.951
GND1 on Bottom Layer "Bottom-GND1" (solid, remove dead copper, pour order 134): 64.3,0 64.3,56.675 111.25,56.675 111.25,0

## Keep-outs
Top:
  region: 111.25,0 111.25,2.5 0,2.5 0,0
  region: 0,100 0,97.5 111.25,97.5 111.25,100
Bottom Layer:
  region: 0,97.5 0,100 111.25,100 111.25,97.5
  region: 0,0 0,2.5 111.25,2.5 111.25,0

## Other copper
Top:
  pour cut-out: -0.35,86.175 -0.35,40.65 -0.15,40.45 17.075,40.45 17.075,85.175 16.3,85.95
  pour cut-out: 20.519,58.375 20.519,56.12 20.499,56.1 20.499,55.544 25.506,55.544 25.506,40.706 25.511,40.689 26.3,40.689 26.3,58.317
  pour cut-out: 55.58,42.911 -2.3,42.912 -2.3,40.689 7.657,40.689 55.58,40.689
  pour cut-out: 10.5,52 19.15,52 19.15,42.1 10.5,42.1
L2:
  pour cut-out: 20.525,58.402 22.875,58.398 22.875,56.125 20.5,56.125
  pour cut-out: -2.3,40.7 55.575,40.7 55.575,42.925 -2.3,42.925
L3:
  pour cut-out: 64.32,27.8 64.32,56.625 63.575,56.625 63.55,56.65 63.54,56.64 63.54,27.78
  pour cut-out: 111.25,56.65 63.55,56.65 63.55,57.464 111.25,57.464
Bottom Layer:
  pour cut-out: 6.32,16.96 11.86,16.96 11.86,2.57 6.32,2.57
  pour cut-out: 20.525,58.575 22.85,58.575 22.85,56.3 20.5,56.3
  pour cut-out: -2.3,42.925 -2.3,40.7 55.575,40.7 55.575,42.838

## Silkscreen, mask and mechanical layers (free items; w line width, h text height)
Top Overlay:
  lines w0.254: 13.825,41.7 19.65,41.7 19.65,48.8 13.825,48.8 13.825,41.7
  text "J1" at 65.75,93 h1.52
  text "COMMON" at 12.275,85.075 h0.75
  text "FB OFFSET" at 57.15,84.139 h0.75
  text "HIGH" at 12.125,80.2 h0.75
  text "P12V0A" at 55.925,77.3 h0.75
  text "GND" at 35.275,75.875 h0.75
  text "LOW" at 13.225,75.525 h0.75
  text "N12V0A" at 55.925,72.625 h0.75
  text "J2" at 26.275,60.1 h1.52
  text "Populate R47,48,49,50 / only to connect clean GND with power GND" at 84.7,59.5 h0.7
  text "N15V0" at 100.675,59.4 h0.75
  text "FB Iset" at 14.825,58.175 h0.75
  text "P15V0" at 75.4,55.9 h0.75
  text "GND" at 71.45,54.925 h0.75
  text "J5" at 65.625,51.6 h1.52
  text "Populate if not using transformer" at 12.75,49.675 h0.75
  text "Stabilizer / Current Sense AFE / Rev 1.2 / 2025" at 31.075,46.8 h1.52
  text "P5V0" at 55.85,42.95 h0.75
  text "V_ERR" at 45.859,38.106 h0.75
  text "V_DIFF" at 34.594,37.671 h0.75
  text "MOSI" at 58.225,22.605 h0.75
  text "OFFSET" at 53.084,19.955 h0.75
  text "CLK" at 58.875,19.664 h0.75
  text "CS" at 59.6,17 h0.78
  text "V_DAC" at 52.709,15.382 h0.75
  text "GND" at 35.35,12.025 h0.75
  text "12V0AS" at 68.625,4.35 h0.75
  text "V_REF" at 40.77,2.07 h0.75
Mechanical 1:
  the board outline again, w0.1
Mechanical 32:
  the board outline again, w0.254

## Text inside footprints (layer, text, board x,y; h text height)
J3: Top Overlay "1" at -1.9,84.405 h0.75 r270; Top Overlay "2" at -1.9,79.405 h0.75 r270; Top Overlay "3" at -1.9,74.405 h0.75 r270
J4: Top Overlay "6" at 8.695,39.585 h0.75 r90; Top Overlay "9" at 8.67,52.135 h0.75 r90; Top Overlay "1" at 11.195,38.76 h0.75 r90; Top Overlay "5" at 11.21,53.505 h0.75 r90; Mechanical 14 "9 D-Sub Female" at 5.92,39.71 h0.75 r90; Mechanical 14 "6" at 8.695,39.585 h0.75 r90; Mechanical 14 "9" at 8.67,52.135 h0.75 r90; Mechanical 14 "1" at 11.195,38.76 h0.75 r90; Mechanical 14 "5" at 11.21,53.505 h0.75 r90